# Allegro board A523-EVB-AXP717C-LPDDR4-4X-32X1-V1-0.brd
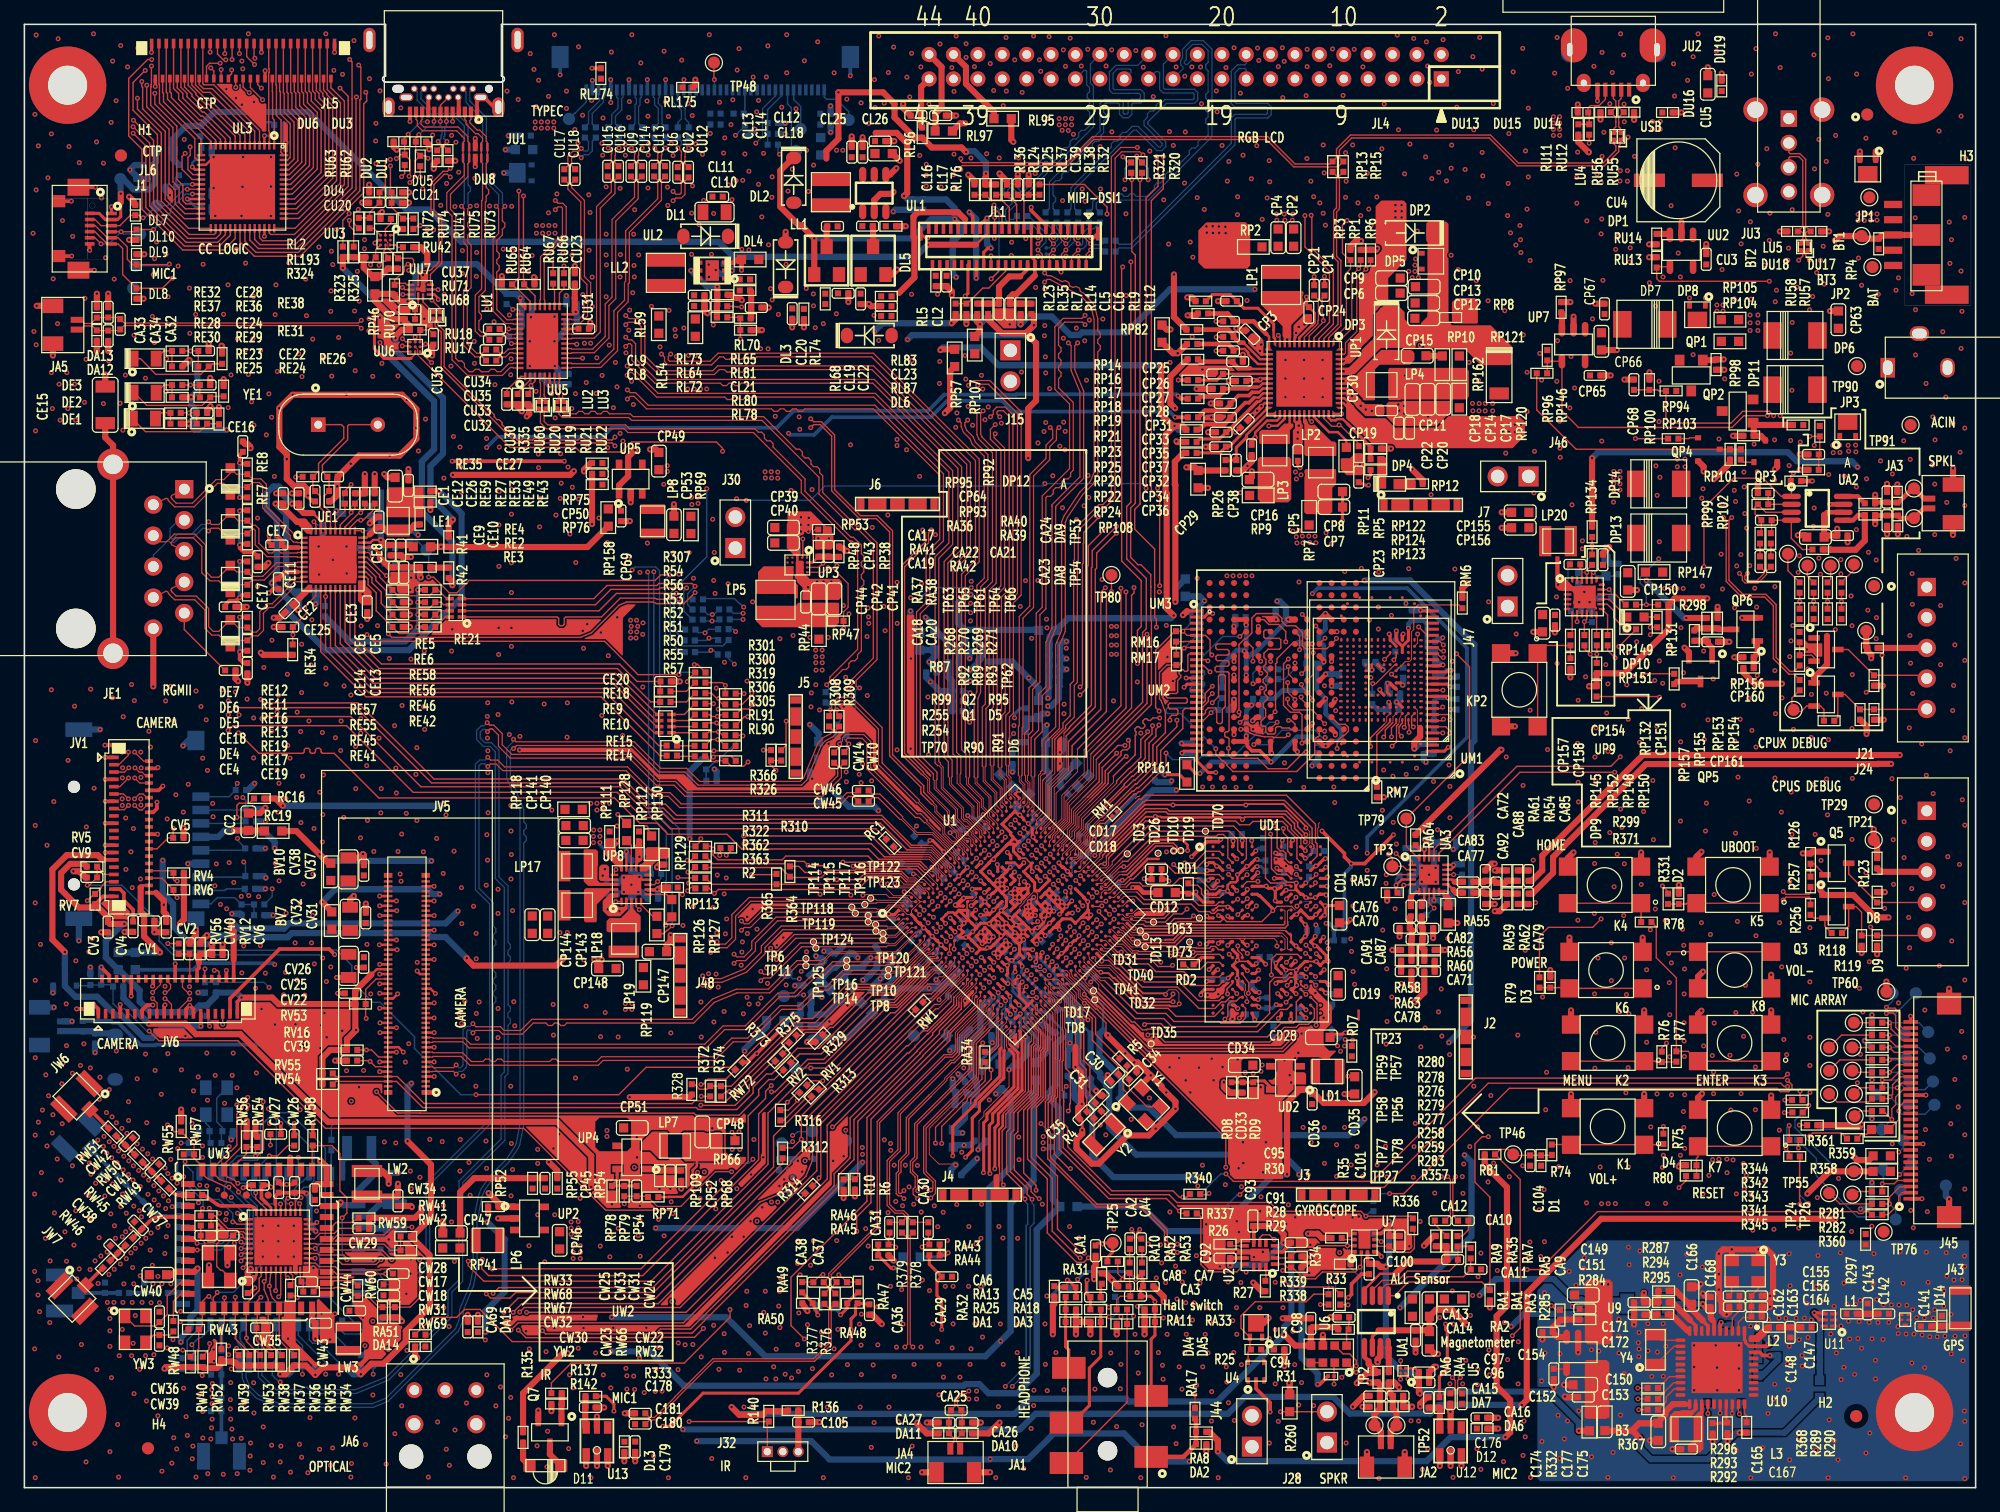
[diagram p0: board, top side]
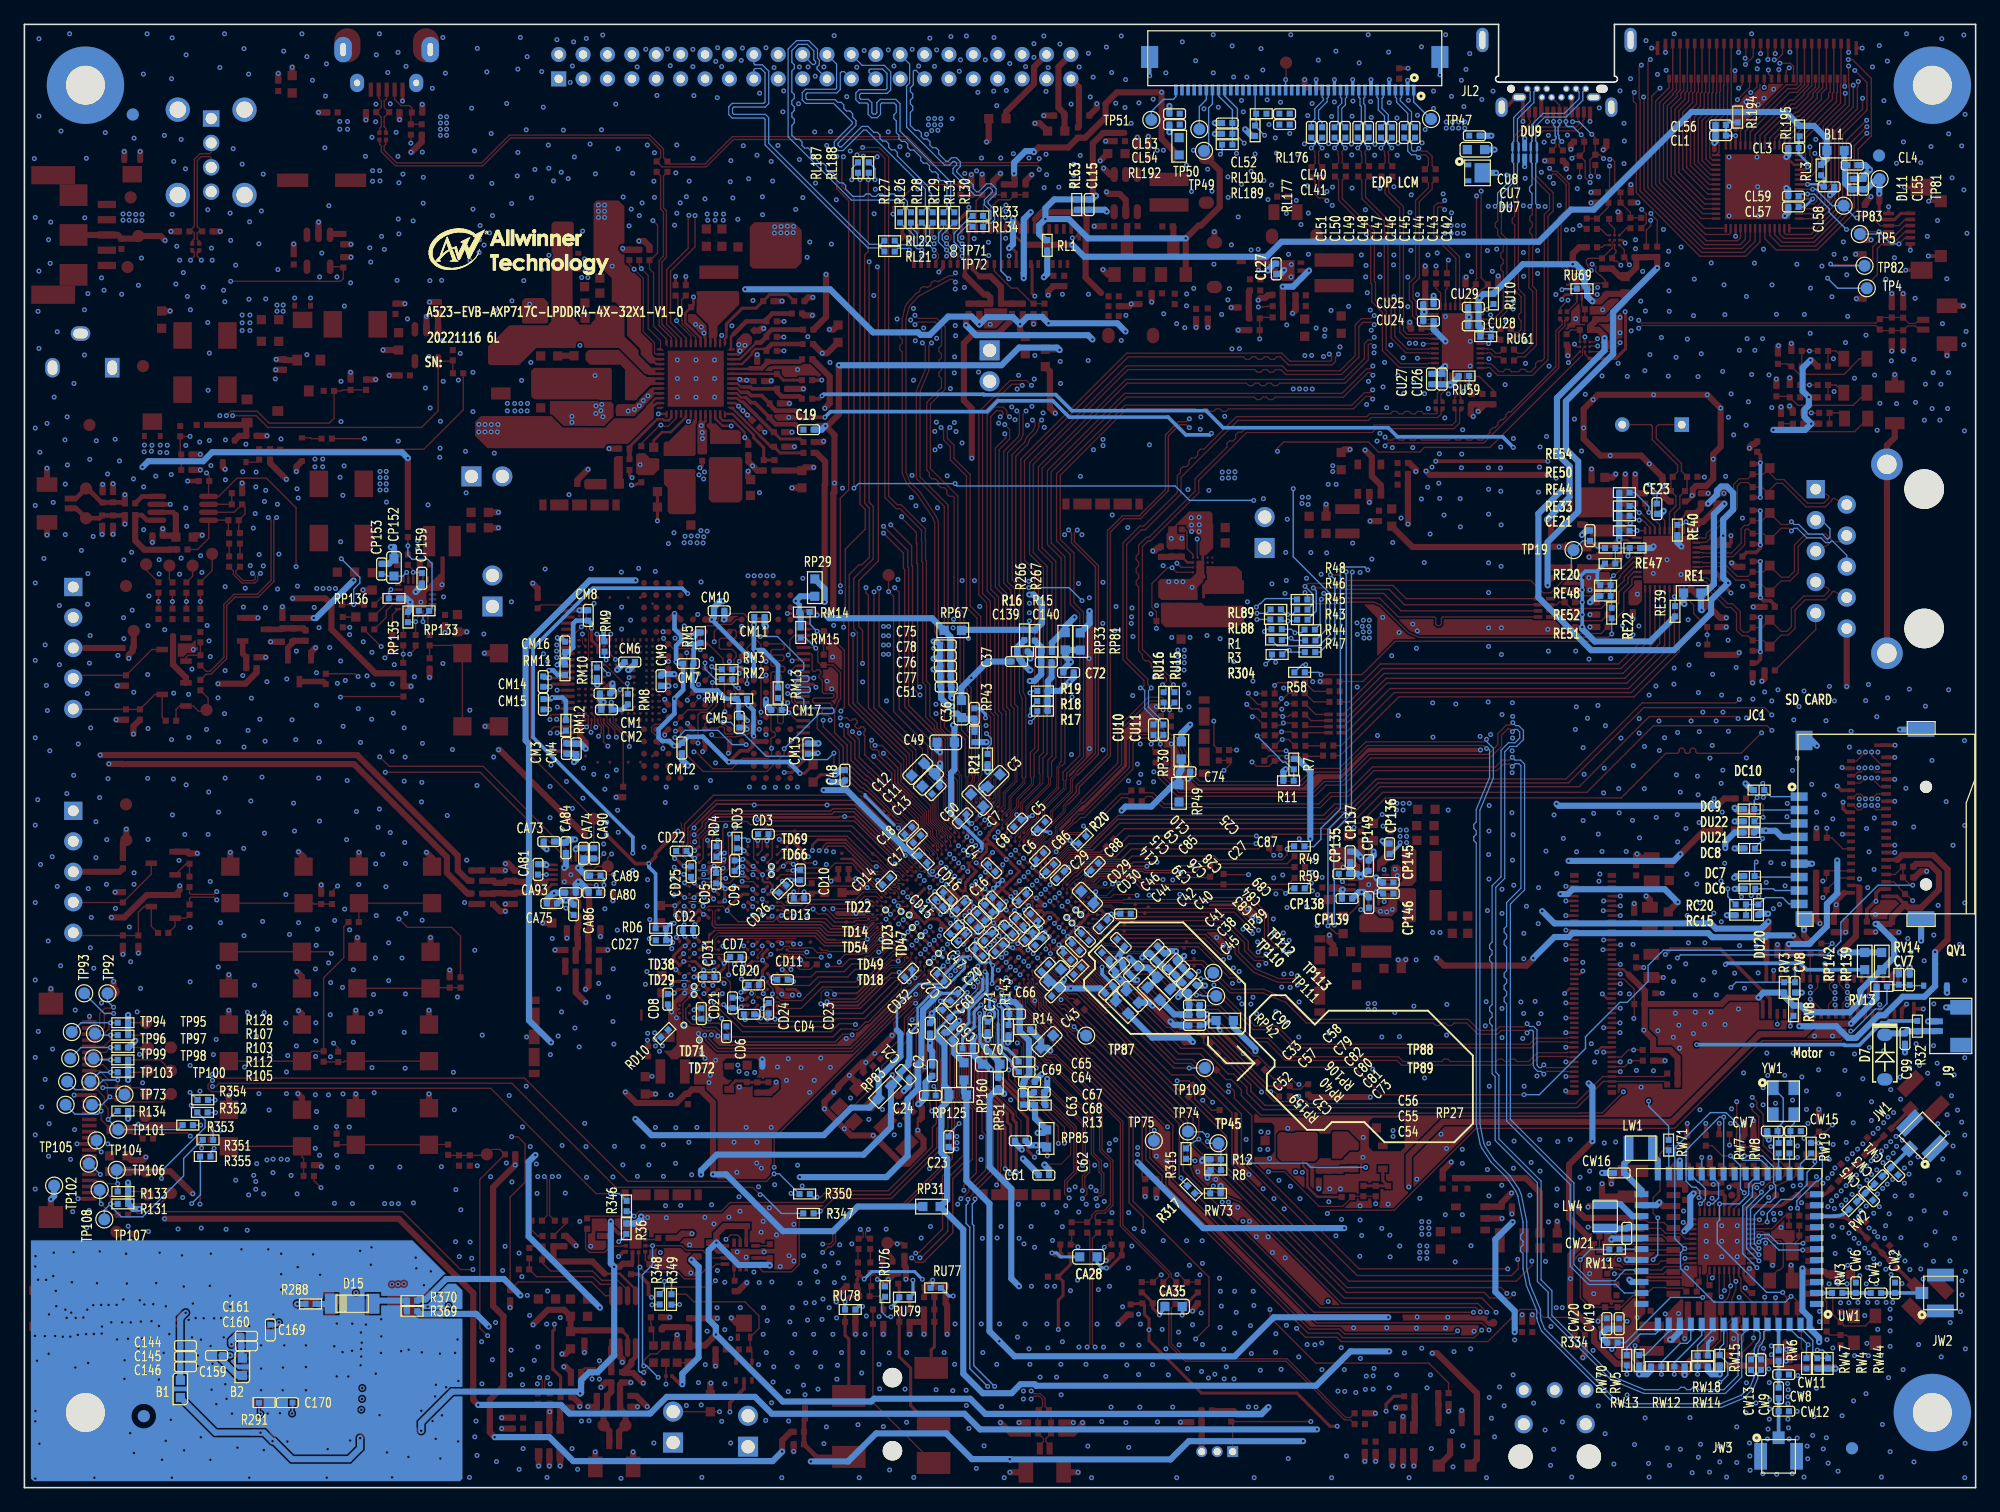
[diagram p1: board, bottom side, seen from below]

Outline 159.99 x 120 mm; copper layers: TOP, L2GND, L3, L4, L5GND, BOTTOM. Coordinates in mm from the lower left corner of the outline.
Outline path: 0,120 0,0 ; 0,120 29.62,120 ; 0,120 0,0 ; 0,120 29.62,120 ; 0,0 159.99,0 ; 0,0 159.99,0 ; 29.62,120 29.62,115.77 ; 29.62,120 29.62,115.77 ; 159.99,0 159.99,120 ; 159.99,0 159.99,120 ; 29.62,115.77 arc(29.37,115.52) 29.62,115.27 39.12,115.27 arc(39.37,115.52) 39.12,115.77 ; 39.12,120 39.12,115.77 ; 39.12,120 39.12,115.77 ; 39.12,120 159.99,120 ; 39.12,120 159.99,120

## Design rules (mm)
net group DP12: nets MIC2N-MIC MIC2P-MIC
net group DP13: nets MIC1N-MIC MIC1P-MIC
net group DP14: nets CPUS-RX CPUS-TX
net group DP15: nets CPUX-RX CPUX-TX
net group DP16: nets MICIN2N-1 MICIN2P-1
net group DP17: nets MICIN1N-1 MICIN1P-1
net group DP40: nets N1092981 N1092985
net group EDP-AUXN: nets EDP-AUXN N18084734
net group EDP-AUXP: nets EDP-AUXP N18084736
net group EDP-TX0N: nets EDP-TX0N N18084786
net group EDP-TX0P: nets EDP-TX0P N18084789
net group EDP-TX1N: nets EDP-TX1N N18084780
net group EDP-TX1P: nets EDP-TX1P N18084783
net group EDP-TX2N: nets EDP-TX2N N18084774
net group EDP-TX2P: nets EDP-TX2P N18084777
net group EDP-TX3N: nets EDP-TX3N N18084768
net group EDP-TX3P: nets EDP-TX3P N18084771
net group EDPAUX: nets EDPAUXN EDPAUXP
net group EDPTX0: nets EDPTX0N EDPTX0P
net group EDPTX1: nets EDPTX1N EDPTX1P
net group EDPTX2: nets EDPTX2N EDPTX2P
net group EDPTX3: nets EDPTX3N EDPTX3P
net group LCD-CLK: nets LCD-CLK MIPI-DSI1-DP3
net group LCD-D14: nets LCD-D14 MIPI-DSI1-DP0
net group LCD-D15: nets LCD-D15 MIPI-DSI1-DN0
net group LCD-D18: nets LCD-D18 MIPI-DSI1-DP1
net group LCD-D19: nets LCD-D19 MIPI-DSI1-DN1
net group LCD-D20: nets LCD-D20 MIPI-DSI1-CKP
net group LCD-D21: nets LCD-D21 MIPI-DSI1-CKN
net group LCD-D22: nets LCD-D22 MIPI-DSI1-DP2
net group LCD-D23: nets LCD-D23 MIPI-DSI1-DN2
net group LCD-DE: nets LCD-DE MIPI-DSI1-DN3
net group LINEOUTL: nets LINEOUTLN LINEOUTLP
net group LINEOUTR: nets LINEOUTRN LINEOUTRP
net group MICIN1: nets MICIN1N MICIN1P
net group MICIN2: nets MICIN2N MICIN2P
net group MICIN3: nets MICIN3N MICIN3P
net group NCE1: nets N18077723 NCE1
net group NRE: nets N18233774 NRE
net group PCIE-REFCLKN: nets PCIE21-REFCLKN PCIE-REFCLKN
net group PCIE-REFCLKP: nets PCIE21-REFCLKP PCIE-REFCLKP
net group PG2: nets PG2 WL-SDIO-D0
net group PG3: nets PG3 WL-SDIO-D1
net group PG4: nets PG4 WL-SDIO-D2
net group SDC0: nets SDC0-CMD SDC0-DET
net group SDC0-CLK: nets N1091840 SDC0-CLK
net group SPKL: nets SPKL+ SPKL-
net group SPKR: nets SPKR+ SPKR-
net group TX-1N: nets TX-1N TX-1N-1
net group TX-1P: nets TX-1P TX-1P-1
net group TX-2N: nets TX-2N TX-2N-1
net group TX-2P: nets TX-2P TX-2P-1
net group USB0-DM: nets USB0-DM USB0-DM-1
net group USB0-DP: nets USB0-DP USB0-DP-1
net group USB1-DM: nets USB1-DM USB1-DM-1
net group USB1-DP: nets USB1-DP USB1-DP-1
net group WL-SDIO-CLK: nets N18228701 WL-SDIO-CLK
net group ALL: nets 323-ALDO1 323-DCDC1/2 323-DLDO1 323-RTCLDO ACIN-DET AECLN AECLP AECRN AECRP AFVCC-CSI ALDO-OUT AP6275P-XTAL-IN AP6275P-XTAL-OUT AP-CK24M-OUT AP-CK32K-OUT AP-NMI AP-RESET AP-WAKE-BT BL-PWMI BOOT-SEL-ADC BT-PCM-CLK BT-PCM-DIN BT-PCM-DOUT BT-PCM-SYNC BT-RESETN BT-UART-CTS BT-UART-RTS BT-UART-RX BT-UART-TX BT-WAKE-AP CC1 CC1-AXP717C CC2 CC2-AXP717C CC-INT CHASIS-GND CLKOUT-125M CODEC0-AVDD CPUS-TCK CPUS-TDI CPUS-TDO CPUS-TMS CPUX-TCK CPUX-TDI CPUX-TDO CPUX-TMS CTP-INT CTP-RST DCICLK DCIDATA DCXO-XIN DCXO-XOUT DDR-PARA-SEL-ADC DDR-PARA-SEL-GPIO DM DMIC-CLK DMIC-DATA0 DMIC-DATA1 DMIC-DATA2 DMIC-DATA3 DP DSP-TMS DVDD DVDD-IO EDP-BL-EN EDP-BL-PWMI EDP-HPD EDP-REXT EINT-HAL EPHY-CLK-25M ETA6973-NCE ETA6973-NINT ETA6973-NPG ETA6973-PMID ETA6973-SYS ETA6973-VBAT FEL GPADC2 GPADC3 GPS-3V3 GS-INT GYRO-INT1 GYRO-INT2 HP-DET HS-MIC I2S0-BCLK I2S0-DIN I2S0-LRCK I2S0-MCLK INTB IR-RX IR-TX JTAG-SEL L/R LCD-BL-EN LCD-HSYNC LCD-PIO0 LCD-PIO1 LCD-PIO2 LCD-PWM LCD-RST LCD-RST-1 LCD-STBYB LCD-VSYNC LCM-IOVDD LCM-VDD33 LDO-X-OUT LED0/CFG-EXT LED1/CFG-LDO0 LED2/CFG-LDO1 LED+ LED- LED-EN LEDC LPCLK LRADC0 LRADC1 MBIAS1 MBIAS2 MCSI-MCLK-R MCSI-RST-F MCSI-RST-R MCSI-SCK-R MCSI-SDA-R MCSI-STBY-F MCSI-STBY-R MCSID-MCLK MCSID-PWDN MCSID-RESET MCSID-SCK MCSID-SDA MDC MDIO MIC-GND-SEL N1087342 N1088260 N1093724 N1093956 N1094712 N1094791 N1095302 N1095364 N1096390 N1096517 N16421057 N16566582 N16566747 N16567953 N16568422 N16568800 N16661587 N16662202 N16662230 N16662659 N16663042 N16664614 N16798343 N16798378 N16798443 N16798500 N16798814 N16799414 N16799432 N16800403 N16805924 N16806097 N16813673 N16923769 N16924183 N17035212 N17035282 N17037266 N17037268 N17037327 N17038121 N17038143 N17038224 N17337322 N17337425 N17337534 N17337538 N17337608 N17426429 N17426431 N17426498 N17426503 N17426522 N17426640 N17467627 N17468103 N17468111 N17468127 N17468131 N17468138 N17470655 N17471197 N17519084 N17519086 N17519099 N17519105 N17519132 N17519160 N17519961 N17519994 N17520011 N17520013 N17520210 N17525369 N17526407 N17526892 N17526894 N17526934 N17528681 N17528689 N17534062 N17535435 N17535437 N17535446 N17535460 N17535579 N17685568 N17798838 N17798910 N17798979 N17799135 N17799149 N17799183 N17799225 N17827806 N17890269 N17890359 N17985538 N17985543 N17985576 N17985621 N18051541 N18054592 N18054594 N18054805 N18054807 N18060885 N18077256 N18077260 N18078189 N18082854 N18082873 N18082895 N18083739 N18084794 N18085570 N18087944 N18092985 N18092991 N18095044 N18107499 N18107551 N18107553 N18107555 N18107561 N18107664 N18107676 N18108402 N18108444 N18108466 N18108468 N18108474 N18108577 N18108579 N18110855 N18110859 N18111147 N18111149 N18153999 N18154006 N18154026 N18154494 N18154896 N18154924 N18156054 N18156189 N18156196 N18156203 N18157235 N18157238 N18157241 N18157244 N18157733 N18157736 N18157739 N18157742 N18174693 N18174727 N18174889 N18174923 N18174933 N18174967 N18175003 N18175017 N18175058 N18175060 N18175080 N18175116 N18175118 N18175146 N18175148 N18175196 N18175216 N18190806 N18190929 N18190986 N18191047 N18191051 N18191138 N18191152 N18191222 N18191243 N18197385 N18197390 N18197394 N18197400 N18197583 N18198441 N18198460 N18218999 N18219074 N18219316 N18220262 N18223657 N18223660 N18228273 N18228401 N18247943 N18247946 N18273638 N18273672 N18273714 N18273716 N18273751 N18273767 N18273783 N18273785 N18274335 N18274347 N18279815 N18279822 N18280499 N18453310 N18453461 N18460548 N18461013 N18461022 N18461799 N18462290 N18464343 N18464870 N18505997 N18506037 N18506054 N18513498 N18516675 N18527306 N18527353 N18527380 N18527406 N18530784 N18530810 N18530858 N18530886 N18615287 N18615290 N18672918 N18672921 N180837250 N180837255 N180837256 NCE0 NCLE NQON NRB1 NRBX NWP OTG-EN OWA-OUT PA-EN PA-SHDN PA-VDD PB13 PB14 PCIE21-CLKREQN PCIE21-CLKREQN-1V8 PCIE21-PERSTN PCIE21-PERSTN-1V8 PCIE21-REXT PCIE21-TEST PCIE21-WAKEN PCIE21-WAKEN-1V8 PG10 PH3 PH8 PH9 PH10 PH11 PH12 PH13 PH19 PHYRSTB PK10 PK11 PL4 PL5 PL6 PL7 PL8 PL9 PL10 PL11 PL12 PL13 PLLTEST PMU-SCK PMU-SDA PS-EINT PWRON RGMII-CLKIN-125M RGMII-MDC RGMII-MDIO RSET RTC-I RTC-O RX00 RX01 RX02 RX03 RX04 RX05 RX06 RX07 RX08 RX09 RX10 RX11 RX12 RX13 RX14 RX15 RX16 RX17 RX18 RX19 RX20 RX21 RX22 RX23 RX24 RX25 RX26 RX27 S-PWM-9 SBU1 SBU1-1 SBU2 SBU2-1 SW SW-OUT TS TWI0-SCK TWI0-SDA TWI1-SCK TWI1-SDA TWI2-SCK TWI2-SDA TWI5-SCK TWI5-SDA TX00 TX01 TX02 TX03 TX04 TX05 TX06 TX07 TX08 TX09 TX10 TX11 TX12 TX13 TX14 TX15 TX16 TX17 U/D USB0-DRVVBUS USB0-ID USB0-REXT USB1-DRVVBUS USB1-REXT USB2-REXT USB2-SW USB2-SW-EN USB-VBUS USB-VBUSDET USBVBUS VCC-1V8 VCC-3V3 VCC-PC VCC-PC-SOC VCC-PE-SOC VCC-PG VCC-PL-SOC VCC-PLL VCC-WIFI-PWREN VCOM VDD-GPU VDDI-EMMC VPS1 VREFP-ADC VREFQ WIFI-XTAL-IN WIFI-XTAL-OUT WL-REG-ON WL-WAKE-AP WREQIN X32KIN X32KOUT XTAL1 XTAL2 XTAL-I XTAL-IN XTAL-OUT
net group AUDIO: nets CPVDD CPVEE HBIAS MBIAS VRA1 VRA2 VRP
net group DDR: nets SDQ31 SDQM2 SDQM3 SRST
net group DDR-8MIL: nets SDQ0 SDQ1 SDQ12 SDQ13 SDQ14 SDQ15
net group GPS-RF: nets N18174140 N18174202 N18174264 N18174330 N18174394 N18174411 N18174477 N18174511 N18174542
net group HPOUT: nets HPOUTFB HPOUTL HPOUTR
net group HPOUT-C: nets HPOUTFB-C HPOUTL-C HPOUTR-C
net group PCIE-RDN: nets PCIE-RDN U3-PCIE21-TXN USB3-TXN USB3-TXN-1
net group PCIE-RDP: nets PCIE-RDP U3-PCIE21-TXP USB3-TXP USB3-TXP-1
net group PCIE-TDN: nets PCIE21-RDN PCIE-TDN U3-PCIE21-RXN USB3-RXN USB3-RXN-1
net group PCIE-TDP: nets PCIE21-RDP PCIE-TDP U3-PCIE21-RXP USB3-RXP USB3-RXP-1
net group PH0: nets PH0 RGMII-RXD1 RXD1/TXDLY
net group PH1: nets PH1 RGMII-RXD0 RXD0/RXDLY
net group PH2: nets PH2 RGMII-RXCTL RXCTL/PHYAD2
net group PH4: nets PH4 RGMII-TXD1 TXD1
net group PH5: nets PH5 RGMII-TXD0 TXD0
net group PH6: nets PH6 RGMII-TXCK TXC
net group PH7: nets PH7 RGMII-TXCTL TXCTL
net group PH14: nets PH14 RGMII-RXD3 RXD3/PHYAD0
net group PH15: nets PH15 RGMII-RXD2 RXD2/PLLOFF
net group PH16: nets PH16 RGMII-RXCK RXC/PHYAD1
net group PH17: nets PH17 RGMII-TXD3 TXD3
net group PH18: nets PH18 RGMII-TXD2 TXD2
net group POWER: nets ALDO1 ALDO2 ALDO4 BLDO2 BLDO3 CLDO1 CLDO2 CPUSLDO N1088466 N1088629 N1088707 N1088786 N1089598 N1089793 N1089860 N1089928 N1091371 N1091434 N1091500 N1091567 N17526923 VCM-ADC VPS0
net group PWR: nets AVCC AVDD10 DCDC4 DVDD33 DVDDRG N17035175 N17044842 REGOUT VCC33-18-USB VCC33-18-USB-2 VCC33-EPHY VCC33-USB VCC-CARD-3V3 VCC-CTP1 VCC-PK VCC-PM VDD09-USB VDD-CPUBFB VDD-CPULFB VDD-DE VDD-DNRFB VDD-SYSFB VDD-VE
nets with their own width: min track width 0.305; nets BLDO1 BLDO4 N16794099

## Placement (name value [footprint] x y rotation side)
B1  2.2K-0.05A  [L0603]  147.21 8.09 270 bottom
B2  31R-0.3A  [L0603]  142.12 9.9 270 bottom
B3  120R-0.3A  [L0603]  129.59 5.39 270 top
BA1  600R/100M  [L0603]  115.21 14.76 270 top
BL1  PZ1608U471-1R0TF  [L0603]  11.49 109.65 180 bottom
BT1  test  [TP100]  151.28 105.82 90 top
BT2  test  [TP100]  150.65 102.64 90 top
BT3  test  [TP100]  151.54 100.1 270 top
BV7  100R-1A  [L0603]  25.2 46.5 90 top
BV10  100R-1A  [L0603]  25.13 50.5 90 top
C1  2.2uF  [C0402]  85.73 37.67 90 bottom
C2  100nF  [C0402]  85.55 34.2 270 bottom
C3  NC/22uF  [C0603]  80.5 57.98 315 bottom
C4  4.7uF  [C0402]  80.69 50.8 45 bottom
C5  NC/4.7uF  [C0402]  76.59 54.31 315 bottom
C6  NC/2.2uF  [C0402]  76.73 51.78 315 bottom
C7  22uF  [C0603]  81.88 56.37 225 bottom
C8  2.2uF  [C0402]  78.55 54.48 135 bottom
C9  2.2uF  [C0402]  80.93 47.49 225 bottom
C10  100nF  [C0402]  80.31 48.09 225 bottom
C11  22uF  [C0603]  85.86 58.01 135 bottom
C12  NC/22uF  [C0603]  86.74 58.9 135 bottom
C13  4.7uF  [C0402]  85.26 57.19 135 bottom
C14  4.7uF  [C0402]  82.11 46.23 225 bottom
C15  2.2uF  [C0402]  81.55 46.81 225 bottom
C16  2.2uF  [C0402]  83.23 47.7 315 bottom
C17  100nF  [C0402]  86.81 53.19 315 bottom
C18  100nF  [C0402]  87.51 53.88 315 bottom
C19  100nF  [C0402]  95.7 86.76 0 bottom
C20  100nF  [C0402]  83.77 40.23 315 bottom
C21  1uF  [C0402]  87.73 33.86 225 bottom
C22  100nF  [C0402]  84.86 41.83 45 bottom
C23  1nF  [C0402]  84.2 28.37 270 bottom
C24  1nF  [C0402]  85.7 32.16 0 bottom
C25  22uF  [C0603]  72.83 48.4 225 bottom
C26  2.2uF  [C0402]  78.39 46.36 225 bottom
C27  2.2uF  [C0402]  71.51 46.26 135 bottom
C28  100nF  [C0402]  77.21 46.77 225 bottom
C29  100nF  [C0402]  75.04 50.23 135 bottom
C30  18pF-C0G  [C0402]  89.4 33.61 225 top
C31  22pF-C0G  [C0402]  88.1 31.85 45 top
C32  22uF  [C0603]  69.13 40.27 225 bottom
C33  100nF  [C0402]  70.23 42.63 135 bottom
C34  18pF-C0G  [C0402]  90.9 33.78 45 top
C35  22pF-C0G  [C0402]  86.82 30.54 225 top
C36  22uF  [C0603]  83.16 63.85 90 bottom
C37  100nF  [C0402]  82.1 63.49 90 bottom
C38  22uF  [C0603]  75.5 42 315 bottom
C39  2.2uF  [C0402]  79.28 45.69 45 bottom
C40  2.2uF  [C0402]  76.81 44.77 135 bottom
C41  100nF  [C0402]  76.31 42.64 315 bottom
C42  100nF  [C0402]  77.62 45.22 135 bottom
C43  22uF  [C0603]  76.15 36.58 315 bottom
C44  2.2uF  [C0402]  80.08 44.24 135 bottom
C45  2.2uF  [C0402]  75.46 40.6 135 bottom
C46  100nF  [C0402]  80.96 45.15 135 bottom
C47  100nF  [C0402]  81.72 43.9 45 bottom
C48  100nF  [C0402]  92.71 58.42 270 bottom
C49  10uF  [C0603]  84.45 61.13 0 bottom
C50  100nF  [C0402]  83.06 54.9 135 bottom
C51  100nF  [C0402]  84.41 65.66 0 bottom
C52  100nF  [C0402]  71.06 40.84 315 bottom
C54  100nF  [C0402]  64.05 37.9 0 bottom
C55  1uF  [C0402]  64.04 38.76 180 bottom
C56  100nF  [C0402]  64.05 39.58 180 bottom
C57  100nF  [C0402]  69.02 42.35 315 bottom
C58  100nF  [C0402]  67.39 44.11 135 bottom
C59  100nF  [C0402]  84.25 37.03 45 bottom
C60  100nF  [C0402]  84.4 38.86 45 bottom
C61  100nF  [C0402]  76.4 25.63 180 bottom
C62  2.2uF  [C0402]  78.33 28.45 0 bottom
C63  2.2uF  [C0402]  78.11 31.83 90 bottom
C64  470nF  [C0402]  78.03 34.1 180 bottom
C65  470nF  [C0402]  78.04 34.93 180 bottom
C66  470nF  [C0402]  78.81 38.84 180 bottom
C67  470nF  [C0402]  77.57 33.27 0 bottom
C68  2.2uF  [C0402]  76.78 32.44 0 bottom
C69  10uF  [C0603]  80.71 34.73 0 bottom
C70  2.2uF  [C0402]  82.65 36.02 180 bottom
C71  2.2uF  [C0402]  81.02 37.78 270 bottom
C72  100nF  [C0402]  74.38 66.85 180 bottom
C73  100nF  [C0402]  64.23 40.92 135 bottom
C74  100nF  [C0402]  64.83 58.71 180 bottom
C75  1uF  [C0402]  84.49 69.12 0 bottom
C76  1uF  [C0402]  84.47 67.38 0 bottom
C77  100nF  [C0402]  84.46 66.53 0 bottom
C78  100nF  [C0402]  84.49 68.25 0 bottom
C79  1uF  [C0402]  66.84 43.53 135 bottom
C80  1uF  [C0402]  65.29 42.34 135 bottom
C81  100nF  [C0402]  64.69 41.71 135 bottom
C82  100nF  [C0402]  65.86 42.93 135 bottom
C83  1uF  [C0402]  74.49 43.57 45 bottom
C84  1uF  [C0402]  73.79 44.35 45 bottom
C85  100nF  [C0402]  78.16 48.4 315 bottom
C86  NC/100nF  [C0402]  75.89 50.82 315 bottom
C87  1uF  [C0402]  69.7 47.06 0 bottom
C88  1uF  [C0402]  72.22 50.92 315 bottom
C89  100nF  [C0402]  73.02 45.16 45 bottom
C90  NC/100nF  [C0402]  70.08 44.68 225 bottom
C91  10nF  [C0402]  104.29 20.09 0 top
C92  100nF  [C0402]  98.45 18.82 180 top
C93  2.2uF  [C0402]  100.74 21.87 90 top
C94  100nF  [C0402]  102.9 11.33 0 top
C95  NC/2.2uF  [C0402]  108.2 13.97 180 top
C96  NC/1uF  [C0402]  114.76 8.6 0 top
C97  NC/100nF  [C0402]  114.76 9.49 0 top
C98  NC/2.2uF  [C0402]  105.49 13.46 90 top
C99  47pF  [C0402]  5.79 36.83 270 bottom
C100  100nF  [C0402]  110.26 17.93 270 top
C101  100nF  [C0402]  112.8 20.22 270 top
C104  1nF  [C0402]  123.47 26.82 90 top
C105  100nF  [C0402]  63.89 5.36 180 top
C139  100nF  [C0402]  78.64 67.74 0 bottom
C140  100nF  [C0402]  76.19 67.7 180 bottom
C141  18pF  [C0402]  155.93 13.23 180 top
C142  18pF  [C0402]  152.46 14.25 180 top
C143  2.7pF  [C0402]  151.15 14.67 90 top
C144  1uF  [C0402]  146.79 11.64 180 bottom
C145  100nF  [C0402]  146.79 10.75 180 bottom
C146  33nF  [C0402]  146.79 9.92 180 bottom
C147  18pF  [C0402]  146.12 13.15 180 top
C148  2.7pF  [C0402]  144.79 12.73 270 top
C149  10uF  [C0603]  127.82 15.8 180 top
C150  10uF  [C0603]  127.7 8.44 180 top
C151  1uF  [C0402]  127.95 14.66 180 top
C152  33nF  [C0402]  125.41 9.32 270 top
C153  1uF  [C0402]  127.82 7.42 180 top
C154  NC/100nF  [C0402]  124.9 12.75 180 top
C155  100nF  [C0402]  142.04 15.73 0 top
C156  1uF  [C0402]  142.04 14.84 0 top
C159  4.7uF  [C0402]  144.23 10.84 180 bottom
C160  4.7uF  [C0402]  141.78 11.62 0 bottom
C161  1uF  [C0402]  141.8 12.42 0 bottom
C162  1nF-C0G  [C0402]  140.21 15.73 180 top
C163  NC/10pF-C0G  [C0402]  140.21 14.84 0 top
C164  4.7uF  [C0402]  142.03 14.02 180 top
C165  10uF  [C0603]  133.97 4.57 270 top
C166  10uF  [C0603]  136.7 15.76 270 top
C167  4.7uF  [C0402]  136.27 3.16 0 top
C168  4.7uF  [C0402]  138.28 15.21 90 top
C169  4.7uF  [C0402]  139.83 12.94 270 bottom
C170  4.7uF  [C0402]  138.43 6.97 0 bottom
C171  4.7uF  [C0402]  132.4 15.19 180 top
C172  1uF  [C0402]  132.42 14.18 180 top
C174  100nF  [C0402]  115.14 6.99 90 top
C175  100nF  [C0402]  117.89 7.3 270 top
C176  15pF  [C0402]  119.52 5.73 180 top
C177  100nF  [C0402]  116.92 7.31 270 top
C178  100nF  [C0402]  46.41 6.57 0 top
C179  15pF  [C0402]  50.08 3.35 90 top
C180  100nF  [C0402]  50.5 5.21 180 top
C181  100nF  [C0402]  50.5 6.1 180 top
CA1  2.2uF  [C0402]  87.83 19.43 270 top
CA2  100nF  [C0402]  90.65 19.99 270 top
CA3  33pF  [C0402]  91.11 15.7 0 top
CA4  100nF  [C0402]  91.59 19.99 270 top
CA5  100nF  [C0402]  87.83 15.62 0 top
CA6  100nF  [C0402]  85.76 16.43 180 top
CA7  NC/33pF  [C0402]  92.15 16.51 0 top
CA8  1nF  [C0402]  90.12 16.51 180 top
CA9  NC/1uF  [C0402]  119.02 17.9 0 top
CA10  100nF  [C0402]  117.98 21.89 180 top
CA11  NC  [C0402]  117.12 18.69 0 top
CA12  100nF  [C0402]  116.08 21.89 0 top
CA13  1uF  [C0402]  114.07 12.47 270 top
CA14  10uF  [C0603]  115.21 12.09 270 top
CA15  NC/1nF  [C0402]  110.73 7.52 180 top
CA16  NC/1nF  [C0402]  112.63 7.52 0 top
CA17  NC/1uF  [C0402]  142.57 81.56 180 top
CA18  100nF  [C0402]  142.32 75.95 270 top
CA19  NC  [C0402]  142.85 79.34 180 top
CA20  100nF  [C0402]  143.21 75.95 270 top
CA21  1uF  [C0402]  149.07 78.08 0 top
CA22  10uF  [C0603]  146.86 77.95 180 top
CA23  NC/1nF  [C0402]  152.73 79.3 270 top
CA24  NC/1nF  [C0402]  152.73 81.23 90 top
CA25  100pF  [C0402]  76.4 6.35 0 top
CA26  33pF  [C0402]  77.29 5.33 0 top
CA27  33pF  [C0402]  75.39 5.33 0 top
CA28  22uF  [C0603]  72.75 18.92 180 bottom
CA29  1uF  [C0402]  75.64 17.3 180 top
CA30  100nF  [C0402]  74.12 21.34 270 top
CA31  100nF  [C0402]  70.94 21.34 270 top
CA32  100pF  [C0402]  7.86 95.41 270 top
CA33  33pF  [C0402]  6.87 96.39 270 top
CA34  33pF  [C0402]  6.87 94.46 270 top
CA35  22uF  [C0603]  65.77 14.85 180 bottom
CA36  1uF  [C0402]  69.29 14.61 90 top
CA37  100nF  [C0402]  67.02 16.85 0 top
CA38  100nF  [C0402]  65.12 16.85 180 top
CA69  2.2uF  [C0402]  36.35 13.18 90 top
CA70  470nF  [C0402]  114.58 47.27 90 top
CA71  0R  [C0402]  115.21 42.32 0 top
CA72  10nF  [C0402]  119.79 50.19 90 top
CA73  1uF  [C0402]  116.99 52.98 0 bottom
CA74  1uF  [C0402]  114.15 52.02 270 bottom
CA75  100nF  [C0402]  116.74 47.9 180 bottom
CA76  470nF  [C0402]  113.69 47.27 90 top
CA77  470nF  [C0402]  118.39 48.79 180 top
CA78  0R  [C0402]  113.31 42.32 180 top
CA79  0R  [C0402]  123.34 48.29 270 top
CA80  1uF  [C0402]  113.31 48.79 0 bottom
CA81  1uF  [C0402]  117.88 50.7 90 bottom
CA82  NC  [C0402]  114.2 44.98 180 top
CA83  470nF  [C0402]  118.39 49.68 180 top
CA84  1uF  [C0402]  115.6 52.48 270 bottom
CA85  0R  [C0402]  123.34 50.19 90 top
CA86  1uF  [C0402]  114.96 47.4 90 bottom
CA87  10nF  [C0402]  115.09 45.87 180 top
CA88  NC  [C0402]  120.68 49.17 90 top
CA89  100nF  [C0402]  113.18 50.19 0 bottom
CA90  100nF  [C0402]  113.26 52.02 270 bottom
CA91  10nF  [C0402]  113.18 45.87 180 top
CA92  10nF  [C0402]  119.79 48.29 90 top
CA93  100nF  [C0402]  115.21 48.79 180 bottom
CC2  4.7uF  [C0603]  18.36 54.61 90 top
CD1  10uF  [C0603]  107.84 47.03 270 top
CD2  2.2uF  [C0402]  105.59 45.69 0 bottom
CD3  2.2uF  [C0402]  99.41 53.59 180 bottom
CD4  NC/2.2uF  [C0402]  100.58 38.82 0 bottom
CD5  2.2uF  [C0402]  103.28 49.98 90 bottom
CD6  2.2uF  [C0402]  102.43 37.4 270 bottom
CD7  2.2uF  [C0402]  101.7 43.52 180 bottom
CD8  100nF  [C0402]  107.23 40.06 270 bottom
CD9  100nF  [C0402]  101.76 51 90 bottom
CD10  100nF  [C0402]  96.37 50.24 270 bottom
CD11  100nF  [C0402]  97.84 41.66 180 bottom
CD12  10uF  [C0603]  93.66 48.8 180 top
CD13  2.2uF  [C0402]  96.48 48.32 0 bottom
CD14  2.2uF  [C0402]  89.32 49.73 315 bottom
CD15  100nF  [C0402]  84.99 47.92 225 bottom
CD16  NC/100nF  [C0402]  84.34 48.52 225 bottom
CD17  2.2uF  [C0402]  92.83 50.72 0 top
CD18  100nF  [C0402]  92.86 49.89 0 top
CD19  10uF  [C0603]  107.72 41.27 90 top
CD20  2.2uF  [C0402]  100.2 41.22 180 bottom
CD21  2.2uF  [C0402]  104.49 38.88 270 bottom
CD22  2.2uF  [C0402]  106.13 52.2 0 bottom
CD23  2.2uF  [C0402]  98.96 39.32 270 bottom
CD24  2.2uF  [C0402]  101.93 39.75 90 bottom
CD25  2.2uF  [C0402]  105.33 50.52 90 bottom
CD26  2.2uF  [C0402]  97.82 49.1 315 bottom
CD27  100nF  [C0402]  107.8 44.88 0 bottom
CD28  NC/10uF  [C0603]  106.35 36.93 180 top
CD29  2.2uF  [C0402]  83.76 45.7 135 bottom
CD30  2.2uF  [C0402]  83.14 45.1 135 bottom
CD31  100nF  [C0402]  103.83 41.88 180 bottom
CD32  100nF  [C0402]  87.52 42.17 135 bottom
CD33  100pF  [C0402]  99.9 32.82 90 top
CD34  10uF  [C0603]  100.03 34.65 180 top
CD35  10uF  [C0603]  109.09 32.99 270 top
CD36  NC  [C0402]  105.59 31.88 270 top
CE1  100nF  [C0402]  21.23 81.12 90 top
CE2  100nF  [C0402]  21.71 72.1 225 top
CE3  100nF  [C0402]  28.11 72.23 90 top
CE4  NC/100nF  [C0402]  16.89 67.02 0 top
CE5  100nF  [C0402]  30.86 76.88 270 top
CE6  100nF  [C0402]  30.02 76.88 270 top
CE7  100nF  [C0402]  20.7 77.31 180 top
CE8  NC/100nF  [C0402]  29.08 79.19 90 top
CE9  4.7uF  [C0603]  30.4 82.14 90 top
CE10  100nF  [C0402]  31.49 82.19 90 top
CE11  100nF  [C0402]  20.82 74.13 270 top
CE12  100nF  [C0402]  22.53 81.12 90 top
CE13  100nF  [C0402]  31.11 75.05 90 top
CE14  4.7uF  [C0402]  30.27 75.05 90 top
CE15  1nF-2KV  [C1206]  6.63 88.8 270 top
CE16  NC/1nF  [C0402]  17.91 85.37 90 top
CE17  NC/1nF  [C0402]  19.12 75.94 270 top
CE18  NC/1nF  [C0402]  16.89 72.23 0 top
CE19  NC/1nF  [C0402]  18.28 67.2 270 top
CE20  NC/22PF  [C0402]  52.58 66.11 0 top
CE21  NC/22PF  [C0402]  31.62 78.07 90 bottom
CE22  NC/100PF  [C0402]  14.56 88.14 0 top
CE23  NC/22PF  [C0402]  26.13 80.28 270 bottom
CE24  NC/100PF  [C0402]  14.81 90.43 0 top
CE25  100nF  [C0402]  21.59 70.58 0 top
CE26  NC/27PF  [C0402]  23.84 81.3 270 top
CE27  NC/27PF  [C0402]  25.27 82.9 0 top
CE28  NC/100PF  [C0402]  14.69 93.22 0 top
CL1  100nF  [C0402]  20.9 110.87 0 bottom
CL2  10nF  [C0402]  75.62 98.96 270 top
CL3  NC/1uF  [C0402]  14.94 109.86 0 bottom
CL4  2.2uF  [C0402]  10.11 108.46 180 bottom
CL5  1uF  [C0402]  79.91 96.67 270 top
CL6  1uF  [C0402]  80.8 96.67 270 top
CL8  4.7uF  [C0402]  55.34 96.9 0 top
CL9  NC/100nF  [C0402]  55.34 97.79 0 top
CL10  4.7uF-50V  [C0805]  56.59 104.6 180 top
CL11  100nF-50V  [C0402]  56.84 105.87 180 top
CL12  100nF-25V  [C0402]  70.17 110.43 180 top
CL13  4.7uF  [C0402]  67.84 109.53 90 top
CL14  NC/100nF  [C0402]  68.73 109.53 90 top
CL15  10nF  [C0402]  72.69 105.22 270 bottom
CL16  100nF-25V  [C0402]  66.26 103.43 0 top
CL17  100nF-25V  [C0402]  69.14 103.45 0 top
CL18  10uF-16V  [C0603]  70.45 109.41 0 top
CL19  100nF-25V  [C0402]  67.14 97.95 0 top
CL20  100nF-25V  [C0402]  62.96 96.28 270 top
CL21  NC/1uF  [C0402]  60.02 96.78 0 top
CL22  100nF-25V  [C0402]  68.57 97.49 270 top
CL23  100nF-25V  [C0402]  70.68 96.89 180 top
CL25  100nF  [C0402]  73.1 112.52 0 top
CL26  100nF  [C0402]  75.13 112.52 0 top
CL27  NC  [C0402]  57.35 99.95 270 bottom
CL39  NC  [C0402]  81.46 106.45 90 top
CL40  1uF  [C0402]  56.67 112.67 0 bottom
CL41  4.7uF  [C0402]  56.67 111.79 0 bottom
CL42  NC/100nF  [C0402]  45.96 111.14 90 bottom
CL43  NC/100nF  [C0402]  46.85 111.14 90 bottom
CL44  NC/100nF  [C0402]  47.87 111.14 90 bottom
CL45  NC/100nF  [C0402]  48.76 111.14 90 bottom
CL46  NC/100nF  [C0402]  49.77 111.14 90 bottom
CL47  NC/100nF  [C0402]  50.66 111.14 90 bottom
CL48  NC/100nF  [C0402]  51.68 111.14 90 bottom
CL49  NC/100nF  [C0402]  52.57 111.14 90 bottom
CL50  NC/100nF  [C0402]  53.58 111.14 90 bottom
CL51  NC/100nF  [C0402]  54.47 111.14 90 bottom
CL52  NC  [C0402]  61.37 111.91 0 bottom
CL53  1nF  [C0402]  65.68 112.67 0 bottom
CL54  4.7uF  [C0402]  65.68 111.79 0 bottom
CL55  100nF  [C0402]  9.19 106.9 90 bottom
CL56  1uF  [C0402]  20.9 111.76 0 bottom
CL57  NC/1uF  [C0402]  14.94 105.03 0 bottom
CL58  NC/2.2uF  [C0402]  12.01 106.68 180 bottom
CL59  NC  [C0402]  14.94 105.92 0 bottom
CM1  100nF  [C0402]  112.38 65.13 0 bottom
CM2  1uF  [C0402]  112.26 63.79 0 bottom
CM3  1uF  [C0402]  115.56 60.62 270 bottom
CM4  100nF  [C0402]  114.74 60.59 270 bottom
CM5  NC/100nF  [C0402]  101.37 62.76 270 bottom
CM6  1uF  [C0402]  110.36 67.71 0 bottom
CM7  NC/100nF  [C0402]  105.55 67.58 180 bottom
CM8  100nF  [C0402]  113.76 71.53 90 bottom
CM9  1uF  [C0402]  107.8 66.18 270 bottom
CM10  100nF  [C0402]  103.02 71.91 180 bottom
CM11  1uF  [C0402]  99.72 71.4 180 bottom
CM12  100nF  [C0402]  106.08 60.65 270 bottom
CM13  1uF  [C0402]  95.76 60.6 90 bottom
CM14  100nF  [C0402]  117.46 66.1 270 bottom
CM15  1uF  [C0402]  117.44 64.24 270 bottom
CM16  100nF  [C0402]  115.66 68.95 90 bottom
CM17  100nF  [C0402]  98.32 63.78 0 bottom
CP1  100nF  [C0402]  106.6 98.19 90 top
CP2  22uF  [C0603]  104.07 102.51 90 top
CP3  1uF  [C0402]  100.46 94.6 135 top
CP4  NC/22uF  [C0603]  102.8 102.51 90 top
CP5  1uF  [C0402]  104.42 84.63 270 top
CP6  NC/10uF  [C0603]  112.1 97.96 180 top
CP7  22uF  [C0603]  107.38 80.41 0 top
CP8  NC/22uF  [C0603]  107.38 81.68 0 top
CP9  10uF  [C0603]  112.11 99.19 180 top
CP10  22uF  [C0603]  114.77 98.49 0 top
CP11  1uF  [C0402]  111.7 88.32 0 top
CP12  NC/10uF  [C0603]  114.73 95.9 0 top
CP13  NC/10uF  [C0603]  114.74 97.15 0 top
CP14  22uF  [C0603]  115.05 89.25 90 top
CP15  NC  [C0603]  114.22 92.82 180 top
CP16  22uF  [C0603]  101.15 82.67 180 top
CP17  22uF  [C0603]  116.34 89.26 90 top
CP18  NC/22uF  [C0603]  113.81 89.24 90 top
CP19  2.2uF  [C0402]  100.63 85.1 270 top
CP20  4.7uF  [C0402]  113.58 86.89 90 top
CP21  1uF  [C0402]  105.76 98.19 90 top
CP22  100nF  [C0402]  112.69 86.89 90 top
CP23  1uF  [C0402]  109.41 82.88 270 top
CP24  1uF  [C0402]  105.32 96.39 90 top
CP25  2.2uF  [C0402]  98.99 97.3 180 top
CP26  2.2uF  [C0402]  98.72 95.64 180 top
CP27  2.2uF  [C0402]  98.72 94.37 180 top
CP28  2.2uF  [C0402]  98.72 93.23 180 top
CP29  1uF  [C0402]  100 87.22 225 top
CP30  1uF  [C0402]  99.77 90.75 180 top
CP31  2.2uF  [C0402]  99.49 92.34 0 top
CP32  2.2uF  [C0402]  98.47 87.77 180 top
CP33  2.2uF  [C0402]  97.85 91.33 180 top
CP34  2.2uF  [C0402]  98.12 86.56 180 top
CP35  2.2uF  [C0402]  97.87 90.11 180 top
CP36  2.2uF  [C0402]  98.1 85.37 180 top
CP37  2.2uF  [C0402]  98.47 88.91 180 top
CP38  2.2uF  [C0402]  99.37 83.84 270 top
CP39  22uF  [C0603]  62.24 78.73 0 top
CP40  NC/22uF  [C0603]  62.24 77.47 0 top
CP41  NC/22uF  [C0603]  66.42 72.89 90 top
CP42  22uF  [C0603]  65.14 72.89 90 top
CP43  NC/100nF  [C0402]  65.96 76.77 270 top
CP44  100nF  [C0402]  64.06 72.64 90 top
CP45  100pF  [C0402]  42.69 24.95 90 top
CP46  10uF  [C0603]  43.89 20.28 270 top
CP47  10uF  [C0603]  35.02 20.88 180 top
CP48  10uF  [C0603]  55.59 29.17 90 top
CP49  10uF  [C0603]  52.03 84.19 90 top
CP50  100pF  [C0402]  46.97 83.14 180 top
CP51  10uF  [C0603]  49.84 29.5 0 top
CP52  NC/100nF  [C0402]  52.97 25.58 90 top
CP53  10uF  [C0603]  53.26 78.97 90 top
CP54  100pF  [C0402]  50.2 24.32 270 top
CP63  10uF-10V  [C0603]  148.74 95.78 90 top
CP64  100nF  [C0402]  146.71 84.73 0 top
CP65  1uF  [C0402]  128.8 91.21 180 top
CP66  10uF  [C0603]  129.31 94.01 90 top
CP67  100nF  [C0402]  129.57 96.67 270 top
CP68  100nF  [C0402]  131.98 90.45 270 top
CP69  NC/100nF  [C0402]  48.92 79.69 90 top
CP135  1uF  [C0402]  51.8 50.34 180 bottom
CP136  2.2uF  [C0402]  48.05 52.4 270 bottom
CP137  2.2uF  [C0402]  51.29 51.73 270 bottom
CP138  2.2uF  [C0402]  51.54 48.31 180 bottom
CP139  4.7uF  [C0402]  49.75 47.98 90 bottom
CP140  NC/22uF  [C0603]  45.11 53.08 0 top
CP141  10uF  [C0603]  45.12 54.29 0 top
CP143  NC/22uF  [C0603]  42.91 46.17 270 top
CP144  10uF  [C0603]  41.64 46.17 270 top
CP145  4.7uF  [C0402]  48.16 49.63 0 bottom
CP146  4.7uF  [C0402]  48.16 48.71 0 bottom
CP147  NC/22uF  [C0603]  51.96 43.95 0 top
CP148  10uF  [C0603]  47.81 42.57 180 top
CP149  NC/100nF  [C0402]  49.78 51 270 bottom
CP150  10uF  [C0603]  131.47 74.32 270 top
CP151  1uF  [C0402]  129.44 76.1 90 top
CP152  10uF  [C0603]  129.69 75.46 90 bottom
CP153  1uF  [C0402]  130.71 75.34 90 bottom
CP154  10nF  [C0402]  127.15 75.72 180 top
CP155  22uF  [C0603]  122.66 79.98 180 top
CP156  NC/22uF  [C0603]  122.66 78.71 180 top
CP157  10uF  [C0603]  124.49 70.89 270 top
CP158  1uF  [C0402]  125.5 71.15 270 top
CP159  4.7uF-10V  [C0402]  127.41 74.57 270 bottom
CP160  NC/1uF  [C0402]  141.38 68.1 180 top
CP161  NC/1uF  [C0402]  138.46 69.37 0 top
CU2  100nF  [C0402]  53.57 107.87 270 top
CU3  1uF  [C0402]  137.91 100.74 270 top
CU4  NC/100uF-16V  [CA660H540]  135.62 107.21 180 top
CU5  10uF-10V  [C0603]  138.04 115.09 270 top
CU6  100nF  [C0402]  52.53 107.95 270 top
CU7  10uF-16V  [C0603]  40.97 109.73 180 bottom
CU8  1uF  [C0402]  41.1 110.87 180 bottom
CU9  100nF  [C0402]  49.73 107.95 270 top
CU10  100nF  [C0402]  67.42 62.15 90 bottom
CU11  100nF  [C0402]  66.6 62.15 90 bottom
CU12  100nF  [C0402]  54.46 107.87 270 top
CU13  100nF  [C0402]  51.64 107.95 270 top
CU14  100nF  [C0402]  50.62 107.95 270 top
CU15  100nF  [C0402]  47.83 107.95 270 top
CU16  100nF  [C0402]  48.72 107.95 270 top
CU17  100nF  [C0402]  44.27 107.7 270 top
CU18  100nF  [C0402]  45.16 107.7 270 top
CU20  330pF  [C0402]  28.69 105.38 0 top
CU21  330pF  [C0402]  30.54 105.37 180 top
CU23  100nF  [C0402]  45.13 99.17 270 top
CU24  100nF  [C0402]  44.87 95.66 0 bottom
CU25  100nF  [C0402]  44.87 97.06 0 bottom
CU26  10nF  [C0402]  43.73 90.91 270 bottom
CU27  10nF  [C0402]  44.62 90.91 270 bottom
CU28  100nF  [C0402]  41.19 95.28 180 bottom
CU29  10nF  [C0402]  41.19 96.8 180 bottom
CU30  2.2uF  [C0402]  39.54 89.26 90 top
CU31  100nF  [C0402]  45.86 95.05 180 top
CU32  100nF  [C0402]  38.27 92.44 180 top
CU33  100nF  [C0402]  38.27 93.33 180 top
CU34  100nF  [C0402]  38.55 95.03 180 top
CU35  100nF  [C0402]  38.55 94.14 180 top
CU36  100nF  [C0402]  33.54 94.16 90 top
CU37  100nF  [C0402]  31.61 96.63 0 top
CV1  1uF  [C0402]  10.24 46.48 0 top
CV2  4.7uF  [C0402]  11.63 45.97 270 top
CV3  1uF  [C0402]  6.86 45.97 270 top
CV4  1uF  [C0402]  8.92 46 270 top
CV5  NC  [C0402]  12.62 53.29 0 top
CV6  NC/100nF  [C0402]  15.82 43.69 0 top
CV7  NC/100nF  [C0402]  5.41 41.65 90 bottom
CV8  NC  [C0402]  14.81 41.02 270 bottom
CV9  NC  [C0402]  5.54 50.04 180 top
CV22  100nF  [C0402]  26.7 40.54 0 top
CV25  100nF  [C0402]  27.84 43.08 90 top
CV26  10uF-10V  [C0805]  26.58 42.79 90 top
CV31  100nF  [C0402]  28 46.73 270 top
CV32  10uF-10V  [C0805]  26.71 46.65 270 top
CV37  100nF  [C0402]  27.83 50.63 270 top
CV38  10uF-10V  [C0805]  26.56 50.71 270 top
CV39  NC  [C0402]  26.87 35.02 180 top
CV40  NC  [C0402]  13.54 44.2 90 top
CW1  NC  [C0402]  6.65 25.95 225 bottom
CW2  NC  [C0402]  6.6 16.39 270 bottom
CW3  10pF  [C0402]  7.98 25.22 315 bottom
CW4  10pF  [C0402]  8.17 15.96 0 bottom
CW5  NC  [C0402]  8.73 23.87 225 bottom
CW6  NC  [C0402]  9.82 16.39 270 bottom
CW7  22pF-C0G  [C0402]  16.66 29.24 0 bottom
CW8  10pF  [C0402]  16.15 7.77 90 bottom
CW9  NC/100nF  [C0402]  17.6 10.08 270 bottom
CW10  NC/100nF  [C0402]  67.24 59.89 90 top
CW11  NC  [C0402]  15.73 9.27 0 bottom
CW12  NC  [C0402]  15.73 6.26 0 bottom
CW13  NC/100nF  [C0402]  18.41 10.08 270 bottom
CW14  NC/100nF  [C0402]  66.4 59.87 90 top
CW15  22pF-C0G  [C0402]  14.76 29.24 180 bottom
CW16  4.7uF  [C0402]  29.24 25.81 180 bottom
CW17  100nF  [C0402]  29.87 16.66 180 top
CW18  4.7uF  [C0402]  29.87 15.77 180 top
CW19  1uF  [C0402]  29.23 13.45 90 bottom
CW20  4.7uF  [C0402]  30.24 13.45 90 bottom
CW21  4.7uF  [C0402]  28.6 20.85 90 bottom
CW22  NC/100pF  [C0402]  23.14 16.89 180 top
CW23  100nF  [C0402]  18.31 16.38 270 top
CW24  1uF  [C0402]  23.82 24.02 90 top
CW25  NC/100nF  [C0402]  19.16 24.8 180 top
CW26  1uF  [C0402]  22.12 28.47 90 top
CW27  470nF  [C0402]  20.6 28.98 0 top
CW28  2.2uF  [C0402]  30.63 17.55 0 top
CW29  470nF  [C0402]  27.84 21.23 0 top
CW30  20pF  [C0402]  16.69 20.68 180 top
CW31  4.7uF  [C0402]  22.15 24.6 90 top
CW32  20pF  [C0402]  14.88 20.68 0 top
CW33  100nF  [C0402]  20.85 24.61 90 top
CW34  100nF  [C0402]  30.63 23.52 270 top
CW35  NC  [C0402]  19.46 13.11 180 top
CW36  NC/18pF  [C0402]  11.07 14 90 top
CW37  NC  [C0402]  9.33 21.51 315 top
CW38  NC  [C0402]  7.36 19.54 315 top
CW39  NC/18pF  [C0402]  11.07 12.09 270 top
CW40  10uF  [C0603]  10.95 17.46 180 top
CW41  NC  [C0402]  10.74 26.23 225 top
CW42  NC  [C0402]  8.58 28.39 225 top
CW43  4.7uF  [C0402]  24.28 13.49 180 top
CW44  NC/4.7uF  [C0402]  27.08 14.5 180 top
CW45  NC/100nF  [C0402]  68.8 56.28 0 top
CW46  NC/100nF  [C0402]  68.8 57.17 0 top
D1  ESD5451X-2-TR  [ESD0402]  124.36 26.82 90 top
D2  ESD5451X-2-TR  [ESD0402]  135.66 48.29 270 top
D3  ESD5451X-2-TR  [ESD0402]  125.12 41.43 270 top
D4  ESD5451X-2-TR  [ESD0402]  136.68 26.44 0 top
D5  ESD5451X-2-TR  [ESD0402]  151.66 66.19 90 top
D6  ESD5451X-2-TR  [ESD0402]  151.66 63.4 90 top
D7  XBS104S14  [SOD123]  7.44 35.31 90 bottom
D8  ESD5451X-2-TR  [ESD0402]  151.92 48.41 270 top
D9  ESD5451X-2-TR  [ESD0402]  151.92 44.86 90 top
D11  IR12-21C  [SOD100_300H200]  42.72 1.8 0 top
D12  ESD5451X-2-TR  [ESD0402]  119.52 4.84 180 top
D13  ESD5451X-2-TR  [ESD0402]  49.19 3.34 90 top
D14  ESD9B5VL-2/TR  [ESD0402]  157.23 13.66 270 top
D15  1N4148  [SOD130_264H140]  133.12 15.08 0 bottom
DA1  ESD5451X-2/TR  [ESD0402]  85.8 13.59 180 top
DA2  ESD5451X-2/TR  [ESD0402]  96.49 3.56 180 top
DA3  ESD5451X-2/TR  [ESD0402]  87.83 13.59 0 top
DA4  ESD5451X-2/TR  [ESD0402]  89.99 13.43 0 top
DA5  NC/ESD5451X-2/TR  [ESD0402]  92.28 13.59 0 top
DA6  ESD5451X-2/TR  [ESD0402]  112.63 6.63 180 top
DA7  ESD5451X-2/TR  [ESD0402]  110.73 6.63 0 top
DA8  ESD5451X-2/TR  [ESD0402]  153.62 79.3 90 top
DA9  ESD5451X-2/TR  [ESD0402]  153.58 81.21 270 top
DA10  ESD5451X-2/TR  [ESD0402]  77.29 4.45 180 top
DA11  ESD5451X-2/TR  [ESD0402]  75.39 4.45 0 top
DA12  ESD5451X-2/TR  [ESD0402]  5.94 94.48 90 top
DA13  ESD5451X-2/TR  [ESD0402]  5.94 96.37 270 top
DA14  ESD5451X-2/TR  [ESD0402]  32.46 11.57 0 top
DA15  ESD5451X-2/TR  [ESD0402]  37.19 13.18 270 top
DC6  ESD9B5VL-2-TR  [ESD0402]  18.5 49.11 180 bottom
DC7  ESD9B5VL-2-TR  [ESD0402]  18.55 50.15 180 bottom
DC8  ESD9B5VL-2-TR  [ESD0402]  18.53 52.42 180 bottom
DC9  ESD9B5VL-2-TR  [ESD0402]  18.57 55.65 180 bottom
DC10  ESD9B5VL-2-TR  [ESD0402]  17.75 57.21 180 bottom
DE1  LED-0805-R  [LED0805]  9.8 87.67 180 top
DE2  LED-0805-R  [LED0805]  9.86 89.79 180 top
DE3  LED-0805-R  [LED0805]  9.86 92.59 180 top
DE4  SPD9103W  [SOD130_175H101]  16.89 70.07 270 top
DE5  SPD9103W  [SOD130_175H101]  16.89 74.52 270 top
DE6  SPD9103W  [SOD130_175H101]  16.89 78.83 270 top
DE7  SPD9103W  [SOD130_175H101]  16.89 82.52 270 top
DL1  SS14  [SOD123]  55.86 102.62 0 top
DL2  SS14/1N5819  [SOD123]  63.08 107.21 90 top
DL3  BAT54S  [SOT23-132]  65.78 100.63 0 top
DL4  NC-16V  [SOD123]  62.42 100.29 270 top
DL5  BAT54S  [SOT23-132]  69.59 100.63 0 top
DL6  NC-6.8V  [SOD123]  69.28 94.48 180 top
DL7  ESD5451X-2/TR  [ESD0402]  9.09 104.78 270 top
DL8  ESD5451X-2/TR  [ESD0402]  9.18 97.93 90 top
DL9  ESD5451X-2/TR  [ESD0402]  9.18 100.72 270 top
DL10  ESD5451X-2/TR  [ESD0402]  9.18 102.76 90 top
DL11  ESD5451X-2/TR  [ESD0402]  10.08 106.9 270 bottom
DP1  PTVSHC3N4V5B  [DFN3P130B200_200H65]  151.15 108.13 0 top
DP2  NC  [SOD123]  113.64 102.89 0 top
DP3  NC  [SOD123]  111.69 94.55 90 top
DP4  LED  [LED0603]  111.95 82.32 180 top
DP5  NC/PTVSHC3N12VU  [DFN3P130B200_200H65]  115.33 100.58 90 top
DP6  SS24  [SOD362_432H229]  145.19 94.49 180 top
DP7  SS24  [SOD362_432H229]  132.87 95.4 0 top
DP8  NC/PTVSHC3N12VU  [DFN3P130B200_200H65]  137.19 96.19 0 top
DP9  ESD5451X-2-TR  [ESD0402]  126.77 67.59 90 top
DP10  LED  [LED0603]  132.11 71.4 180 top
DP11  NC/SS24  [SOD362_432H229]  145.19 90.04 180 top
DP12  NC/PTVSHC3N12VU  [DFN3P130B200_200H65]  149.5 87 180 top
DP13  NC/SS24  [SOD362_432H229]  134.01 77.88 180 top
DP14  NC/SS24  [SOD362_432H229]  134.01 82.32 180 top
DU1  ESD9B5VL-2/TR  [ESD0402]  34.73 109.24 90 top
DU2  ESD9B5VL-2/TR  [ESD0402]  33.85 109.24 90 top
DU3  ESD5451X-2/TR  [ESD0402]  32.51 110.38 180 top
DU4  ESD5451X-2/TR  [ESD0402]  28.7 106.23 0 top
DU5  ESD5451X-2/TR  [ESD0402]  30.54 106.23 180 top
DU6  ESD5451X-2/TR  [ESD0402]  30.7 110.39 0 top
DU7  PTVSHC3N24VUP  [DFN3P130B200_200H65]  40.84 107.82 90 bottom
DU8  AZ1345-04F  [RCLAMP0524P]  35.97 109.93 0 top
DU9  AZ1345-04F  [RCLAMP0524P]  37.97 109.93 180 bottom
DU13  ESD5451X-2/TR  [ESD0402]  127.8 112.78 0 top
DU14  ESD9B5VL-2/TR  [ESD0402]  131.57 112.8 180 top
DU15  ESD9B5VL-2/TR  [ESD0402]  129.66 112.8 0 top
DU16  ESD5451X-2/TR  [ESD0402]  134.73 112.78 180 top
DU17  ESD9B5VL-2/TR  [ESD0402]  146.89 103.02 180 top
DU18  ESD9B5VL-2/TR  [ESD0402]  144.99 103.02 0 top
DU19  ESD5451X-2/TR  [ESD0402]  139.18 114.96 270 top
DU20  NC/ESD5451X-2/TR  [ESD0402]  17.81 47.4 90 bottom
DU21  ESD5451X-2/TR  [ESD0402]  18.6 53.73 180 bottom
DU22  ESD5451X-2/TR  [ESD0402]  18.57 54.64 180 bottom
H1  NC/HOLE  [MTH635D320]  3.55 115.01 0 top
H2  NC/HOLE  [MTH635D320]  154.99 6.16 0 top
H3  NC/HOLE  [MTH635D320]  154.99 115.01 0 top
H4  NC/HOLE  [MTH635D320]  3.55 6.16 0 top
J1  NC/FPC-6P-0.5MM-B  [FPC8P50B450_710H150]  4.53 103.24 270 top
J2  NC/ICSRC6508SFR  [SHIELD-N]  118.19 36.96 90 top
J3  NC/ICSRC6508SFR  [SHIELD-N]  107.75 24.01 0 top
J4  NC/ICSRC6508SFR  [SHIELD-N]  78.31 24.02 180 top
J5  NC/ICSRC6508SFR  [SHIELD-N]  63.25 61.59 90 top
J6  NC/ICSRC6508SFR  [SHIELD-N]  71.59 80.67 0 top
J7  NC/ICSRC6508SFR  [SHIELD-N]  114.48 80.59 0 top
J9  0.8T-2PWB  [CON-2P-0_8MM]  3.18 37.84 90 bottom
J15  NC/PCIE21-TEST  [HDR1_2P254B250_508H254]  80.85 92 270 top
J21  CON5  [HDR1_5P250B570_1500H700]  156.49 68.86 0 top
J24  CON5  [HDR1_5P250B570_1500H700]  156.49 50.5 0 top
J28  NC/PLLTEST  [HDR1_2P254B250_508H254]  106.81 4.96 90 top
J30  JTAG-SEL  [HDR1_2P254B250_508H254]  58.3 78.33 90 top
J32  CHQ0038D  [TO3B400_400H230_DIP]  62.19 2.95 0 top
J43  ANT-SMD  [ANT2B160_320H50]  158.75 14.71 270 top
J44  NC/PWM  [HDR1_2P254B250_508H254]  100.66 4.62 90 top
J45  FPC-30P-0.5MM-T-B  [FPC32P50B490_1860H310]  157.37 30.94 90 top
J46  NC/6973-SYS  [HDR1_2P254B250_508H254]  122.07 82.93 180 top
J47  NC/6973-VBAT  [HDR1_2P254B250_508H254]  121.62 73.53 90 top
J48  NC/ICSRC6508SFR  [SHIELD-N]  53.78 42 90 top
JA1  PJ-327F  [HP5B650_1400H500]  88.82 6.02 180 top
JA2  0.8T-2PWB  [CON-2P-0_8MM]  111.63 3.65 0 top
JA3  0.8T-2PWB  [CON-2P-0_8MM]  156.19 80.71 90 top
JA4  0.8T-2PWB  [CON-2P-0_8MM]  76.33 3.21 0 top
JA5  0.8T-2PWB  [CON-2P-0_8MM]  4.29 95.37 270 top
JA6  OWA-OPTICAL  [SPDIF5B965_1360H960]  34.51 3.35 270 top
JC1  TF-SLOT  [SDC13B1450_1472H245]  7.32 54.42 270 bottom
JE1  HFJ11-1G01E  [RJ12P127B1588_2159H1364]  4.11 76.17 270 top
JL1  CON45_LCM  [45PIN_UD_FPC_863]  87.36 103.22 180 top
JL2  FPC-40P-0.5MM-B  [FPC42P50B450_2410H150]  55.83 117.22 0 bottom
JL4  LCD_CN  [IDCN-44]  83.88 117.73 0 top
JL5  CON51PIN_CTP  [FPC-51D-P03-H15]  25.43 118.43 180 top
JL6  -  [FPC-6S-P05-H10-A]  5.36 103.25 90 top
JP1  5P_1.25MM  [CON-R5S-P1_3-H1_5-R]  153.23 102.73 0 top
JP2  NC/J_BAT_TS  [BAT_SMD-3]  155.96 102.73 270 top
JP3  NC/DCIN-5V  [PWR3B500_1110H740]  158.14 91.85 90 top
JU1  Type-C  [USB28P50B865_970H276]  34.37 118.72 180 top
JU2  USB2.0-MICRO-01F  [USB9P65B500_690H240]  130.29 117.5 180 top
JU3  USB-A-02F  [USB8P200B512_1925H1250]  144.68 114.23 180 top
JV1  CON39PIN_CAMERA  [FPC0310-39B2-GXX-L]  7.34 59.89 270 top
JV5  DF40HC-90DS-0.4V  [SEDSKT90P40B294_2060H290]  31.37 41.31 270 top
JV6  CON39PIN_CAMERA  [FPC0310-39B2-GXX-L]  6.06 38.86 0 top
JW1  ANT-IPX  [ANT3B300_310H125]  4.34 28.85 45 bottom
JW2  ANT-IPX  [ANT3B300_310H125]  2.88 15.96 90 bottom
JW3  ANT-IPX  [ANT3B300_310H125]  16.15 2.57 180 bottom
JW6  ANT-IPX  [ANT3B300_310H125]  4.28 32.09 225 top
JW7  ANT-IPX  [ANT3B300_310H125]  3.92 15.5 315 top
K1  VOL+  [KEY4B450_450H380]  129.82 29.62 180 top
K2  MENU  [KEY4B450_450H380]  129.82 36.47 180 top
K3  ENTER  [KEY4B450_450H380]  140.23 36.47 180 top
K4  HOME  [KEY4B450_450H380]  129.57 49.43 180 top
K5  UBOOT  [KEY4B450_450H380]  140.11 49.43 180 top
K6  POWER  [KEY4B450_450H380]  129.69 42.44 180 top
K7  RESET  [KEY4B450_450H380]  140.23 29.49 180 top
K8  VOL-  [KEY4B450_450H380]  140.23 42.44 0 top
KP2  nQON  [KEY4B450_450H380]  122.58 65.43 270 top
L1  6.8nH/300mA  [L0402]  149.83 14.25 180 top
L2  6.8nH/300mA  [L0402]  143.46 13.15 180 top
L3  2.2uH/2A  [LP200_250H100]  136.27 4.81 180 top
LD1  2.2uH-2A  [LP200_250H100]  106.85 34.12 0 top
LE1  2.2uH-1A  [LP160_200H100]  30.65 79.29 90 top
LL1  10uH/1A  [LP300_300H100]  66.13 106.24 270 top
LL2  10uH/1A  [LP300_300H100]  52.6 99.62 90 top
LP1  1.0uH/4A  [LP300_300H100]  103.05 98.63 90 top
LP2  1.0uH/3A  [LP200_250H120]  106.31 84.06 270 top
LP3  1.0uH/1.5A  [LP200_250H120]  102.51 85.05 270 top
LP4  1.0uH/3A  [LP200_250H120]  111.3 90.44 180 top
LP5  0.25uH/5A  [LP300_300H100]  61.59 72.81 270 top
LP6  2.2uH/2A  [LP200_250H100]  38.01 20.28 180 top
LP7  2.2uH/2A  [LP200_250H100]  53.36 28.02 0 top
LP8  2.2uH/1.5A  [LP200_250H100]  51.51 79.25 270 top
LP17  1.0uH/2A  [LP200_250H120]  45.32 50.97 180 top
LP18  1.0uH/3A  [LP200_250H120]  45.33 47.76 180 top
LP19  1.0uH/2A  [LP200_250H120]  49.15 45 270 top
LP20  1.0uH/3A  [LP200_250H120]  125.76 77.62 180 top
LU1  NC/CMF1210DH900MFR  [L_CHOKE_SMD_DLP0NS0806]  33.8 96.14 90 top
LU2  NC/CMF1210UD900MFR  [L_CHOKE_SMD_DLP0NS0806]  42.46 88.75 90 top
LU3  NC/CMF1210UD900MFR  [L_CHOKE_SMD_DLP0NS0806]  43.99 88.75 90 top
LU4  NC/CMF1210DH900MFR  [L_CHOKE_SMD_DLP0NS0806]  130.61 110.82 90 top
LU5  NC/CMF1210DH900MFR  [L_CHOKE_SMD_DLP0NS0806]  145.95 101.75 90 top
LW1  2.2uH  [LP200_250H100]  27.46 27.84 0 bottom
LW2  NC/2.2uH/0.6A  [LP200_250H120]  28.09 24.92 270 top
LW3  NC/2.2uH  [LP200_250H100]  26.57 12.22 90 top
LW4  2.2uH  [LP200_250H100]  30.38 22.25 270 bottom
NOREF  -  []  0 121.5 0 top
NOREF#2  -  [unnamed#2]  10.13 3.23 0 top
NOREF#3  -  [unnamed#2]  150.21 5.86 0 top
NOREF#4  -  [unnamed#2]  151.11 112.61 270 top
NOREF#5  -  []  159.99 0 90 top
NOREF#6  -  [unnamed#2]  7.92 109.25 90 top
NOREF#7  -  []  -41.9 -66.09 0 top
NOREF#8  -  [unnamed#2]  150.21 5.86 180 bottom
NOREF#9  -  [unnamed#2]  151.11 112.61 180 bottom
NOREF#10  -  [unnamed#2]  10.13 3.23 180 bottom
NOREF#11  -  []  126.93 99.07 180 bottom
NOREF#12  -  [unnamed#2]  7.92 109.25 270 bottom
Q1  2N7002  [SOT3P95B130_290H103]  147.72 65.05 0 top
Q2  2N7002  [SOT3P95B130_290H103]  147.72 68.73 0 top
Q3  2N7002  [SOT3P95B130_290H103]  148.61 47.65 0 top
Q5  2N7002  [SOT3P95B130_290H103]  148.61 51.21 0 top
Q7  MMBT3904  [SOT3P95B130_290H103]  43.09 4.53 270 top
QP1  WPM2341A-3/TR  [SOT-23]  136.68 91.21 270 top
QP2  WPM2341A-3/TR  [SOT-23]  140.49 88.29 180 top
QP3  NC/WNT2F04  [SOT23]  142.76 84.99 90 top
QP4  NC/WNT2F04  [SOT23]  138.13 85.15 0 top
QP5  MMBT3904  [SOT3P95B130_290H103]  137.44 67.08 270 top
QP6  MMBT3904  [SOT3P95B130_290H103]  141.12 70.38 180 top
QV1  NC/SI2300  [SOT23]  3.32 42.05 90 bottom
R1  0R  [R0402]  57.32 70.4 180 bottom
R2  0R  [R0402]  55.43 49.15 0 top
R3  0R  [R0402]  57.32 69.51 180 bottom
R4  10M  [R0402]  88.01 30.58 225 top
R5  0R  [R0402]  90.12 34.88 315 top
R6  10K-1%  [R0402]  68.1 24.87 90 top
R7  NC/47K  [R0402]  55.91 59.33 90 bottom
R8  NC/10K-1%  [R0402]  62.31 26.04 180 bottom
R10  3.9K-1%  [R0402]  67.17 24.85 270 top
R11  NC/1K  [R0402]  56.34 57.97 180 bottom
R12  NC-1%  [R0402]  62.31 26.92 0 bottom
R13  0R  [R0402]  76.7 31.37 180 bottom
R14  0R  [R0402]  77.95 37.57 180 bottom
R15  0R  [R0402]  76.17 68.54 0 bottom
R16  0R  [R0402]  78.16 68.57 180 bottom
R17  200R-1%  [R0402]  76.51 63.68 0 bottom
R18  200R-1%  [R0402]  76.52 64.5 0 bottom
R19  200R-1%  [R0402]  76.52 65.34 0 bottom
R20  1K-1%  [R0402]  73.25 53.13 135 bottom
R21  1K-1%  [R0402]  81.02 59.75 90 bottom
R25  47K  [R0402]  100.99 11.33 0 top
R26  0R  [R0402]  98.45 19.96 0 top
R27  0R  [R0402]  101.75 16.54 270 top
R28  2K  [R0402]  104.29 18.95 180 top
R29  2K  [R0402]  104.29 18.06 180 top
R30  NC/22R  [R0402]  108.15 12.98 180 top
R31  NC/10K  [R0201]  107.14 9.14 180 top
R32  2.2R  [R0402]  4.78 37.85 270 bottom
R33  NC/0R  [R0402]  107.59 20.47 180 top
R34  4.7K  [R0402]  108.32 18.33 0 top
R35  NC/10K  [R0402]  111.91 20.22 90 top
R36  0R  [R0402]  110.64 21.23 90 bottom
R41  NC/0.01R-1%  [R0402]  34.79 77.56 270 top
R42  NC/0.01R-1%  [R0402]  34.79 75.02 90 top
R43  NC  [R0402]  54.6 70.36 180 bottom
R44  NC  [R0402]  54.55 69.48 180 bottom
R45  NC  [R0402]  55.21 71.18 180 bottom
R46  NC  [R0402]  55.21 72.01 180 bottom
R47  NC  [R0402]  54.57 68.52 180 bottom
R48  NC  [R0402]  55.22 72.84 180 bottom
R49  NC  [R0402]  55.46 52.59 180 bottom
R50  NC  [R0402]  55.4 61.7 180 top
R51  NC  [R0402]  55.4 62.53 180 top
R52  NC  [R0402]  55.4 63.4 180 top
R53  NC  [R0402]  55.42 64.29 180 top
R54  NC  [R0402]  55.42 66.01 180 top
R55  NC  [R0402]  55.38 60.83 180 top
R56  NC  [R0402]  55.42 65.15 180 top
R57  NC  [R0402]  55.39 59.97 180 top
R58  NC  [R0402]  55.43 66.86 180 bottom
R59  NC  [R0402]  55.43 49.15 180 bottom
R74  6K8-1%  [R0402]  125.25 27.71 90 top
R75  8K2-1%  [R0402]  134.39 28.6 90 top
R76  10K-1%  [R0402]  134.26 35.33 270 top
R77  11K-1%  [R0402]  135.46 35.36 90 top
R78  13K-1%  [R0402]  132.99 46.38 180 top
R79  1K  [R0402]  124.23 41.43 270 top
R80  1K  [R0402]  136.68 25.55 0 top
R81  51K-1%  [R0402]  120.17 27.33 0 top
R87  NC/10K  [R0402]  145.57 71.65 270 top
R89  NC/10K  [R0402]  147.85 71.65 270 top
R90  NC/1K  [R0402]  147.98 62.89 0 top
R91  10K  [R0402]  150.52 63.4 270 top
R92  NC/10K  [R0402]  146.71 71.65 270 top
R93  NC/10K  [R0402]  149 71.65 270 top
R95  NC  [R0402]  151.54 68.86 0 top
R99  10K  [R0402]  145.57 69.75 270 top
R103  NC/10K  [R0402]  151.92 36.09 180 bottom
R105  NC/10K  [R0402]  151.92 34.06 180 bottom
R107  NC/10K  [R0402]  151.92 37.11 180 bottom
R112  NC/10K  [R0402]  151.92 35.08 180 bottom
R118  NC/1K  [R0402]  148.62 45.49 0 top
R119  10K  [R0402]  150.65 44.86 270 top
R123  NC  [R0402]  151.92 51.21 270 top
R126  10K  [R0402]  146.46 51.59 270 top
R128  NC/10K  [R0402]  151.92 38.13 180 bottom
R131  NC/10K  [R0402]  151.92 23.27 180 bottom
R133  NC/10K  [R0402]  151.92 24.28 180 bottom
R134  NC/10K  [R0402]  151.92 30.89 180 bottom
R135  200R  [R0402]  40.89 4.12 90 top
R136  33R  [R0402]  63.04 6.32 180 top
R137  1K  [R0402]  43.64 7.75 0 top
R140  10K  [R0402]  61.04 5.84 90 top
R142  4.7K  [R0402]  43.64 6.86 180 top
R143  NC/0R  [R0402]  79.3 37.52 270 bottom
R254  1K  [R0402]  145.57 65.81 90 top
R255  1K  [R0402]  145.57 67.84 270 top
R256  1K  [R0402]  146.46 47.4 90 top
R257  1K  [R0402]  146.46 49.68 270 top
R258  1K  [R0402]  151.92 32.79 0 top
R259  1K  [R0402]  151.92 31.9 0 top
R260  NC/200R  [R0603]  103.75 6.93 90 top
R266  NC/0R  [R0402]  78 69.92 90 bottom
R267  NC/0R  [R0402]  77.14 69.89 270 bottom
R268  1K  [R0402]  145.57 73.81 270 top
R269  1K  [R0402]  147.85 73.81 270 top
R270  1K  [R0402]  146.71 73.81 270 top
R271  1K  [R0402]  149 73.81 270 top
R276  1K  [R0402]  151.92 36.09 0 top
R277  1K  [R0402]  151.92 34.06 0 top
R278  1K  [R0402]  151.92 37.11 0 top
R279  1K  [R0402]  151.92 35.08 0 top
R280  1K  [R0402]  151.92 38.13 0 top
R281  1K  [R0402]  151.92 24.28 0 top
R282  1K  [R0402]  151.92 23.27 0 top
R283  1K  [R0402]  151.92 30.89 0 top
R284  NC/1K  [R0402]  127.95 13.77 0 top
R285  1K  [R0402]  125.92 14.15 90 top
R287  0R  [R0402]  134.41 16.13 0 top
R288  560R  [R0402]  136.53 15.06 180 bottom
R289  NC/1K  [R0402]  139.65 4.9 90 top
R290  NC/1K  [R0402]  141.23 4.94 90 top
R291  0R  [R0402]  140.34 6.97 0 bottom
R292  1K  [R0402]  133.53 6.39 0 top
R293  1K  [R0402]  133.53 7.28 0 top
R294  0R  [R0402]  134.41 15.19 0 top
R295  0R  [R0402]  134.33 14.2 0 top
R296  1K  [R0402]  133.53 8.17 0 top
R297  0R  [R0402]  150.98 20.37 270 top
R298  10K  [R0402]  134.39 72.42 180 top
R299  10K  [R0402]  128.93 67.21 90 top
R300  0R  [R0402]  57.89 64.24 180 top
R301  0R  [R0402]  57.9 65.12 180 top
R304  0R  [R0402]  57.28 68.33 180 bottom
R305  0R  [R0402]  57.89 61.7 180 top
R306  0R  [R0402]  57.91 62.52 180 top
R307  0R  [R0402]  55.42 66.86 0 top
R308  NC/0R  [R0402]  65.99 62.84 90 top
R309  NC/0R  [R0402]  66.8 62.84 90 top
R310  0R  [R0402]  57.5 52.45 0 top
R311  0R  [R0402]  55.44 52.6 0 top
R312  0R  [R0402]  62.18 27.43 90 top
R313  0R  [R0402]  64.84 32.37 45 top
R314  0R  [R0402]  64.32 24.44 45 top
R315  NC/0R  [R0402]  64.75 27.39 90 bottom
R316  NC/0R  [R0402]  61.99 30.54 270 top
R317  NC/0R  [R0402]  64.32 24.44 45 bottom
R319  0R  [R0402]  57.91 63.37 180 top
R320  0R  [R0402]  91.64 108.25 90 top
R321  0R  [R0402]  90.75 108.25 90 top
R322  0R  [R0402]  55.42 51.78 0 top
R323  2K  [R0402]  29.8 100.39 90 top
R324  2K  [R0402]  28.38 100.9 0 top
R325  10K  [R0402]  30.63 100.39 90 top
R326  0R  [R0402]  62.05 60.05 270 top
R328  2K  [R0402]  54.72 32.66 90 top
R329  2K  [R0402]  65.16 36.85 45 top
R331  1K  [R0402]  134.77 48.29 270 top
R332  NC/0R  [R0402]  116.03 6.99 90 top
R333  NC/0R  [R0402]  46.43 7.49 0 top
R334  0R  [R0402]  29.78 11.89 0 bottom
R335  4.99K-1%  [R0402]  40.43 89.26 90 top
R336  0R  [R0402]  113.85 21.65 90 top
R337  0R  [R0402]  95.71 22.48 180 top
R338  0R  [R0402]  107.9 15.43 270 top
R339  0R  [R0402]  106.93 15.44 270 top
R340  0R  [R0402]  95.98 24.07 180 top
R341  0R  [R0402]  145.16 28.51 180 top
R342  0R  [R0402]  145.39 30.77 180 top
R343  0R  [R0402]  146.6 29.73 180 top
R344  0R  [R0402]  145.37 31.78 180 top
R345  0R  [R0402]  145.16 27.16 180 top
R346  NC  [R0402]  110.62 23.09 90 bottom
R347  NC  [R0402]  95.71 22.49 0 bottom
R348  NC  [R0402]  107.9 15.45 90 bottom
R349  NC  [R0402]  106.93 15.43 90 bottom
R350  NC  [R0402]  96.02 24.08 0 bottom
R351  NC  [R0402]  144.94 28.51 0 bottom
R352  NC  [R0402]  145.39 30.78 0 bottom
R353  NC  [R0402]  146.6 29.73 0 bottom
R354  NC  [R0402]  145.37 31.79 0 bottom
R355  NC  [R0402]  145.16 27.16 0 bottom
R357  NC/0R  [R0603]  152.17 29.36 0 top
R358  0.01R-1%  [R0603]  152.3 25.93 0 top
R359  0.01R-1%  [R0603]  152.3 27.2 0 top
R360  NC  [R0402]  151.92 22.38 0 top
R361  NC  [R0402]  149.87 28.62 0 top
R362  0R  [R0402]  55.42 50.89 0 top
R363  0R  [R0402]  55.42 50 0 top
R364  NC  [R0402]  62.77 50.53 90 top
R365  NC  [R0402]  61.67 49.9 90 top
R366  NC  [R0402]  61.21 60.06 90 top
R367  0R  [R0603]  128.32 5.37 270 top
R368  0R  [R0402]  138.43 4.87 90 top
R369  NC/0R  [R0402]  128.21 14.46 180 bottom
R370  0R  [R0402]  128.21 15.34 180 bottom
R371  NC  [R0402]  128.91 65.3 270 top
R372  0R  [R0402]  56.23 32.51 270 top
R373  0R  [R0402]  61.87 35.29 225 top
R374  NC  [R0402]  57.11 32.5 270 top
